# Altium PCB PCB1.PcbDoc
Units mil, origin at the board's own origin, x right, y up, seen from the top; angles counter-clockwise.
Board outline 1155 x 2185 mil, 2 copper layers (L1, L2), stack 62.756 mil thick; 43 components, 58 nets, 222 pads, 450 vias.
Unrouted connection lines stored in the file: 8.
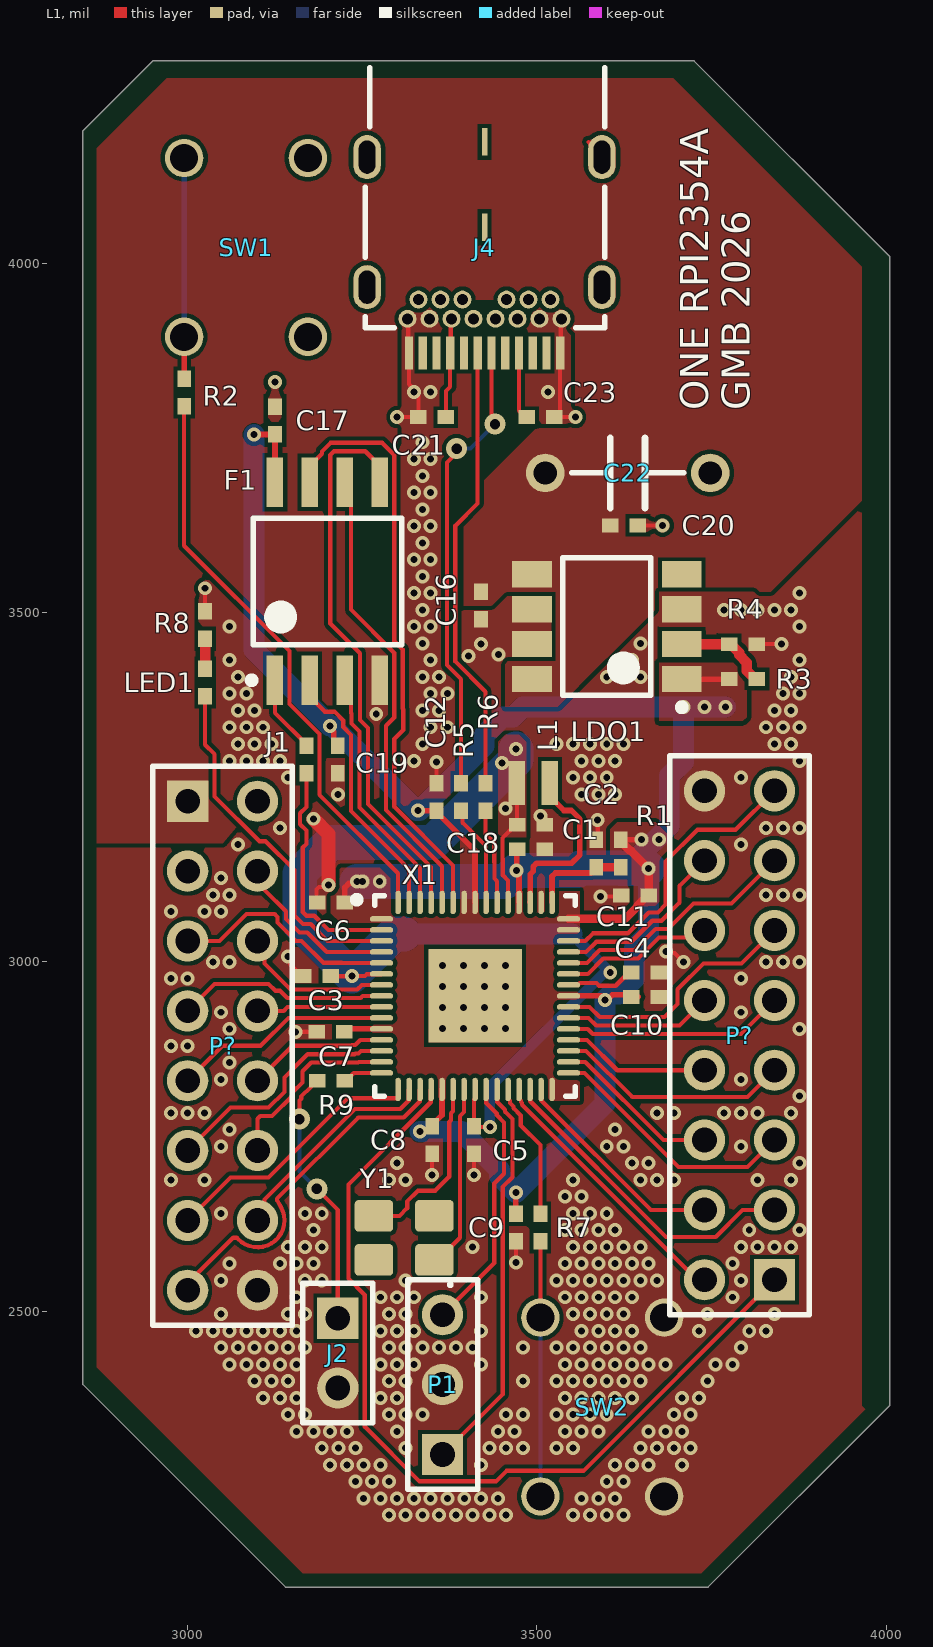
[diagram p0: L1 view]
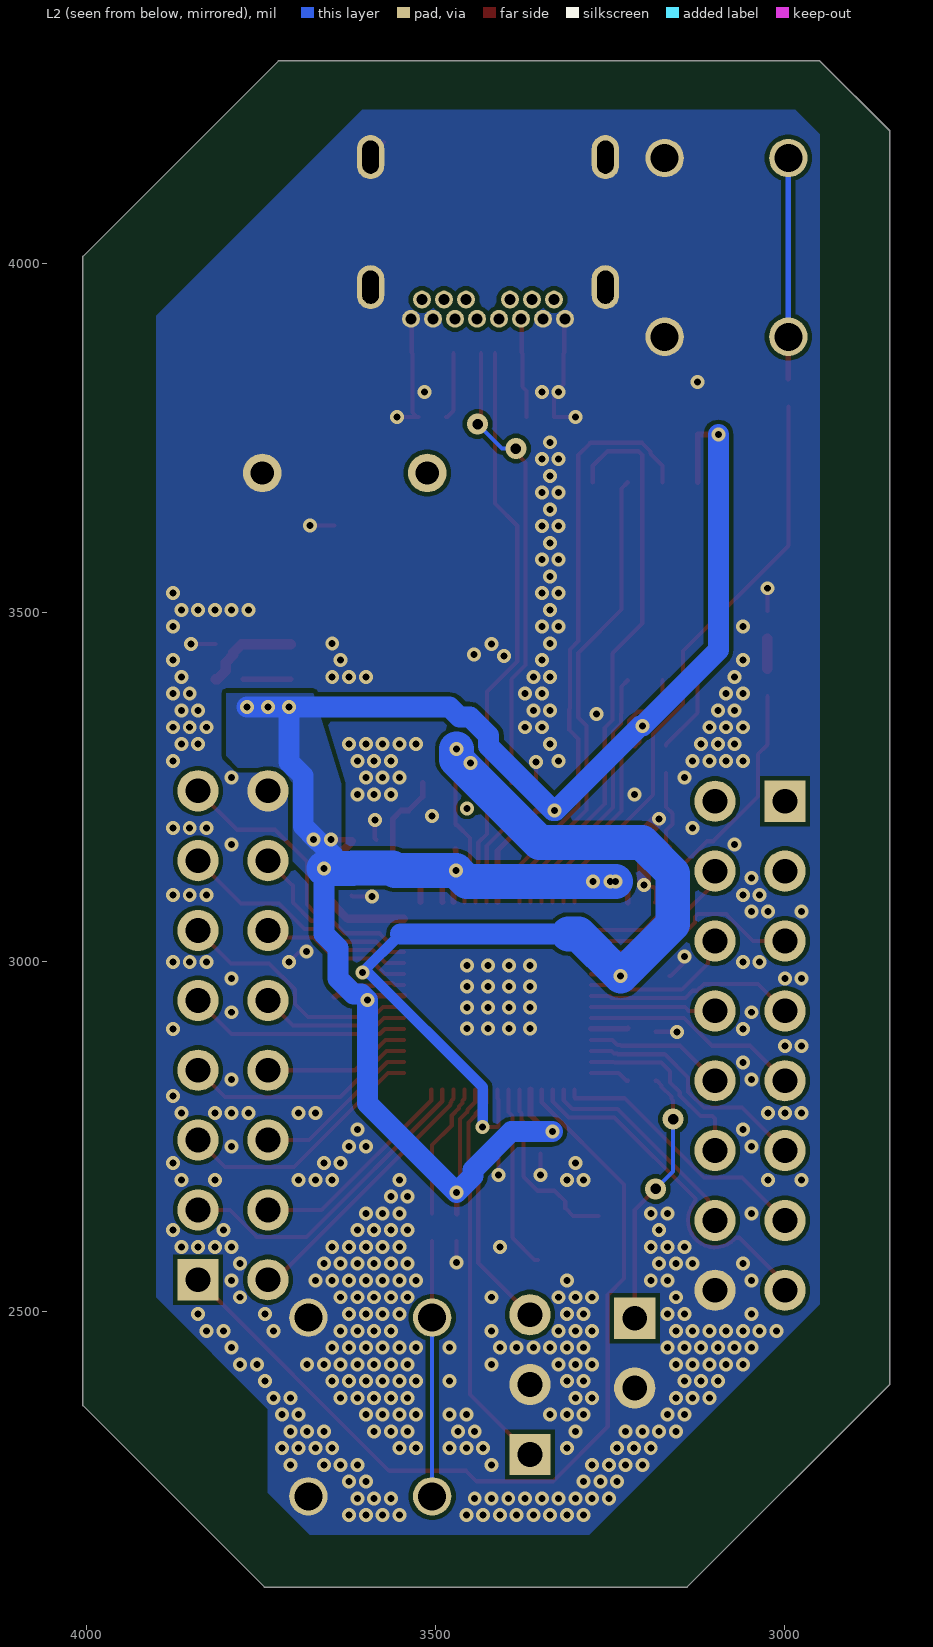
[diagram p1: L2 view, seen from below]

## Layer stack, top to bottom
Top Solder: solder mask 0.1, Solder Resist, Dk 1
L1: signal copper 1.378
Core: dielectric 60, FR-4, Dk 4.6
L2: signal copper 1.378
Bottom Solder: solder mask 0.1, Solder Resist, Dk 1

## Board outline
2850,2395 3140,2105 3745,2105 4005,2365 4005,4010 3725,4290 2950,4290 2850,4190

## Design rules (kind name [scope] priority, off if disabled: settings)
BoardOutlineClearance [All] p1: gap=15 ignorepadtopadclearanceinfootprint=FALSE
Clearance [All] p1: gap=6 ignorepadtopadclearanceinfootprint=FALSE
ComponentClearance [All] p1: gap=1 collisioncheckmode=3 verticalgap=1 showdistances=FALSE
DiffPairsRouting [All] p1: maxlimit=393.7 minlimit=6 mostfreqgap=8 toplayer_minwidth=6 toplayer_maxwidth=15 toplayer_prefwidth=8 bottomlayer_minwidth=6 bottomlayer_maxwidth=15 bottomlayer_prefwidth=8 substack1={1AE4DB25-43DE-4DBF-B0B8-6D5CFC875AB0} toplayer_{1ae4db25-43de-4dbf-b0b8-6d5cfc875ab0}_minwidth=15 toplayer_{1ae4db25-43de-4dbf-b0b8-6d5cfc875ab0}_maxwidth=15 toplayer_{1ae4db25-43de-4dbf-b0b8-6d5cfc875ab0}_prefwidth=15 bottomlayer_{1ae4db25-43de-4dbf-b0b8-6d5cfc875ab0}_minwidth=15 bottomlayer_{1ae4db25-43de-4dbf-b0b8-6d5cfc875ab0}_maxwidth=15 bottomlayer_{1ae4db25-43de-4dbf-b0b8-6d5cfc875ab0}_prefwidth=15 substack2={37110629-F1B0-4C59-9EA7-80770A34A5BA} toplayer_{37110629-f1b0-4c59-9ea7-80770a34a5ba}_minwidth=15 toplayer_{37110629-f1b0-4c59-9ea7-80770a34a5ba}_maxwidth=15 toplayer_{37110629-f1b0-4c59-9ea7-80770a34a5ba}_prefwidth=15 bottomlayer_{37110629-f1b0-4c59-9ea7-80770a34a5ba}_minwidth=15 bottomlayer_{37110629-f1b0-4c59-9ea7-80770a34a5ba}_maxwidth=15 bottomlayer_{37110629-f1b0-4c59-9ea7-80770a34a5ba}_prefwidth=15 maxuncoupledlength=500
HoleSize [All] p1: absolutevalues=TRUE maxlimit=265 minlimit=13 maxpercent=80.000 minpercent=20.000
HoleToHoleClearance [All] p1: gap=10 allowstackedmicrovias=FALSE
MinimumAnnularRing [All] p1: minimumring=7
MinimumSolderMaskSliver [All] p1: minsoldermaskwidth=0
PlaneClearance [All] p1: clearance=10
PlaneConnect [All] p1: planeconnectstyle=Direct reliefexpansion=16 reliefentries=4 reliefconductorwidth=6 reliefairgap=6
PolygonConnect [All] p1: connectstyle=Direct reliefconductorwidth=8 reliefentries=4 polygonreliefangle="90 Angle" airgapwidth=6
RoutingCorners [All] p1: cornerstyle=45-Degree minsetback=49.21 maxsetback=49.21
RoutingVias [All] p1: holewidth=15 width=30 viastyle="Through Hole" minholewidth=10 minwidth=20 maxholewidth=100 maxwidth=114
SilkToSilkClearance [All] p1: silktosilkclearance=0
SilkToSolderMaskClearance [IsPad] p1: minsilkscreentomaskgap=6 clearancetoexposedcopper=TRUE
SolderMaskExpansion [All] p1: expansion=2.95 istentingtop=FALSE
SupplyNets "Schematic Supply Nets_2" [InNet('V5P5V')] p1: voltage=0.000
SupplyNets "Schematic Supply Nets_1" [InNet('GND')] p2: voltage=0.000
SupplyNets "Schematic Supply Nets" [InNet('V3P3V')] p3: voltage=0.000
Width [All] p1: maxlimit=400 minlimit=6 preferedwidth=8 substack1={1AE4DB25-43DE-4DBF-B0B8-6D5CFC875AB0} substack2={37110629-F1B0-4C59-9EA7-80770A34A5BA}
20 further rules are at their usual default settings.

## Classes and differential pairs
component class Master: C1 C2 C3 C4 C5 C6 C7 C8 C9 C10 C11 C12 C16 C17 C18 C19 F1 J1 J2 L1 LDO1 LDO1_Master LED1 P1 R1 R2 R3 R4 R5 R6 R7 R8 R9 SW1 SW2 X1 Y1
component class HUB: C20 C21 C22 C23 J4 P?

## Components (designator, comment, footprint, x,y, rotation, side; value= is the part's Value field where it differs from the comment)
C1 "GMC04X5R475K10NT" 0402 3491.43,3196.38 r180 top value=100pF
C2 "GMC04X5R475K10NT" 0402 3585,3155.31 r270 top value=100pF
C3 "GMC04Y5V104Z10NT" 0402 3185,2980 r0 top value=100pF
C4 "GMC04Y5V104Z10NT" 0402 3655,2985 r180 top value=100pF
C5 "GMC04X5R475K10NT" 0402 3410,2745.31 r90 top value=100pF
C6 "GMC04Y5V104Z10NT" 0402 3205.31,3085 r0 top value=100pF
C7 "GMC04Y5V104Z10NT" 0402 3204.68,2900 r0 top value=100pF
C8 "GMC04Y5V104Z10NT" 0402 3350,2745 r90 top value=100pF
C9 "GMC04Y5V104Z10NT" 0402 3470,2620 r90 top value=100pF
C10 "GMC04Y5V104Z10NT" 0402 3655,2950 r180 top value=100pF
C11 "GMC04Y5V104Z10NT" 0402 3640.31,3095 r0 top value=100pF
C12 "GMC04Y5V104Z10NT" 0402 3356.43,3236.06 r270 top value=100pF
C16 "GMC10X5R106K6R3NT" 0402 3420,3510 r90 top value=100pF
C17 "GMC10X5R106K6R3NT" 0402 3125,3775 r270 top value=100pF
C18 "GMC04X5R475K10NT" 0402 3491.43,3161.38 r180 top value=100pF
C19 "GMC04Y5V104Z10NT" 0402 3215,3290 r90 top value=100pF
C20 "GMC10X5R106K6R3NT" 0402 3625,3625 r180 top value=100pF
C21 "GMC10X5R106K6R3NT" 0402 3350,3780 r0 top value=100pF
C22 "Electrolytic" "Axial C - small" 3630,3700 r270 top value=100pF
C23 "GMC10X5R106K6R3NT" 0402 3505,3780 r180 top value=100pF
F1 "AT25SF128A-SHB-T" SOIC127P800X216-8N 3200,3545 r90 top
J1 "RM04J000CT" 0402 3170,3290 r90 top value=1K
J2 "jumper_1x2" HDR1X2 3215,2490 r270 top
J4 "632723100011" 632723100011 3425,4105 r180 top
L1 "WIP201610S-4R7MLDG" 2016[0806] 3471.43,3256.38 r0 top value=10mH
LDO1 "ADPL42010A" SOIC127P600X175-8N 3600,3480 r180 top
LED1 "LC292LGCT-5A-U1" 0402 3025,3400 r90 top
P1 "Debug" HDR1X3 3365,2295 r90 top
P? "Header 16" HDR2X8 3840,2545 r90 top
P? "Header 16" HDR2X8 3000,3230 r270 top
R1 "RM04J330CT" 0402 3620,3155 r90 top value=1K
R2 "RM04J102CT" 0402 2995,3815 r270 top value=1K
R3 "RM04F5760CT" 0402 3795,3405 r180 top value=1K
R4 "RM04J102CT" 0402 3795.32,3455 r180 top value=1K
R5 "RMCF0402JT27R0" 0402 3391.43,3236.38 r270 top value=1K
R6 "RMCF0402JT27R0" 0402 3426.43,3236.38 r270 top value=1K
R7 "RM04J102CT" 0402 3505,2620 r270 top value=1K
R8 "RM04J102CT" 0402 3025,3482.56 r270 top value=1K
R9 "RM04J102CT" 0402 3205,2830 r0 top value=1K
SW1 "PushButton" CT11024.3F260 3172.17,4150.91 r270 top
SW2 "PushButton" CT11024.3F260 3505,2235 r90 top
X1 "RPI2354A" QFN40P700X700X85_HS-61N 3411.43,2951.38 r0 top
Y1 "12M10PI/XT324-10/20" DFN320X250X70-4N 3310,2605 r180 top

## Footprints (in the part's own frame and the unit in brackets; to place one, negate y for a bottom-side part, rotate by r counter-clockwise, add the part's x,y. Pads: shape width x height; smd on the part's side, far side on the other; paste and mask are expansions set on the pad)
0402 [mm] "Chip Capacitor, Body 1.0x0.5mm, IPC High Density"
  rect 0.6x0.5 smd: 1(-0.5,0) 2(0.5,0)
  body extent -0.55,-0.3 0.55,0.3, height 1.3
2016[0806] [mm]
  rect 0.6x1.6 smd: 1(0,0) 2(1.2,0)
  body extent -0.06,-0.62 1.2,0.64, height 1.3
632723100011 [mm] "USB 3.1 Type C Receptacle Horizontal THR"
  rect 0.3x1.2 smd: A1(-2.75,5.93) A2(-2.25,5.93) A3(-1.75,5.93) A4(-1.25,5.93) A5(-0.75,5.93) A6(-0.25,5.93) A7(0.25,5.93) A8(0.75,5.93) A9(1.25,5.93) A10(1.75,5.93) A11(2.25,5.93) A12(2.75,5.93)
  round 0.65 hole 0.4: B1(2.8,4.68) B2(2.4,3.98) B3(1.6,3.98) B4(1.2,4.68) B5(0.8,3.98) B6(0.4,4.68) B7(-0.4,4.68) B8(-0.8,3.98) B9(-1.2,4.68) B10(-1.6,3.98) B11(-2.4,3.98) B12(-2.8,4.68) Shell(-2,4.68) Shell(2,4.68)
  oval 1x1.6 hole 0.6 slot 1.2 at 90 deg: Shell(-4.27,3.53) Shell(-4.27,-1.2) Shell(4.27,3.53) Shell(4.27,-1.2)
  rect 0.2x1 smd: Shell(0,1.35) Shell(0,-1.75)
  silkscreen extent -4.37,-4.45 4.34,5, body extent -4.37,-5.62 4.37,6.2, height 3.05
"Axial C - small" [mm]
  round 1.4 hole 0.85: 1(0,-3) 2(0,3)
  silkscreen extent -1.27,-2.03 1.27,2.03
CT11024.3F260 [mil]
  round 55 hole 40: 1(0,0) 1(255.91,0) 2(0,-177.17) 2(255.91,-177.17)
  body extent 0,-177 256,0, height 169
DFN320X250X70-4N [mm] "DFN, 4-Leads, Body 3.20x2.50mm, Pitch 2.10mm, IPC Medium Density"
  rrect25% 1.4x1.15 smd: 1(-1.1,0.8) 2(1.1,-0.8) 3(-1.1,-0.8) 4(1.1,0.8)
  silkscreen extent -1.74,1.64 -1.61,1.76, body extent -1.6,-1.25 1.6,1.25, height 0.7
HDR1X2 [mm] "Connector; Header; 2 Position"
  rect 1.5x1.5 hole 0.9: 1(0,0)
  round 1.5 hole 0.9: 2(2.54,0)
  silkscreen extent -1.27,-1.27 3.81,1.27
HDR1X3 [mm] "Connector; Header; 3 Position"
  rect 1.5x1.5 hole 0.9: 1(0,0)
  round 1.5 hole 0.9: 2(2.54,0) 3(5.08,0)
  silkscreen extent -1.27,-1.27 6.35,1.27
HDR2X8 [mm] "Connector; Header; 8x2 Position"
  rect 1.5x1.5 hole 0.9: 1(0,0)
  round 1.5 hole 0.9: 2(0,2.54) 3(2.54,0) 4(2.54,2.54) 5(5.08,0) 6(5.08,2.54) 7(7.62,0) 8(7.62,2.54) 9(10.16,0) 10(10.16,2.54) 11(12.7,0) 12(12.7,2.54) 13(15.24,0) 14(15.24,2.54) 15(17.78,0) 16(17.78,2.54)
  silkscreen extent -1.27,-1.27 19.05,3.81
QFN40P700X700X85_HS-61N [mm] "QFN, 60-Leads, Body 7.00x7.00mm, Pitch 0.40mm, Thermal Pad 3.40x3.40mm, IPC Medium Density"
  oval 0.85x0.2 smd: 1(-3.4,2.8) 2(-3.4,2.4) 3(-3.4,2) 4(-3.4,1.6) 5(-3.4,1.2) 6(-3.4,0.8) 7(-3.4,0.4) 8(-3.4,0) 9(-3.4,-0.4) 10(-3.4,-0.8) 11(-3.4,-1.2) 12(-3.4,-1.6) 13(-3.4,-2) 14(-3.4,-2.4) 15(-3.4,-2.8) 31(3.4,-2.8) 32(3.4,-2.4) 33(3.4,-2) 34(3.4,-1.6) 35(3.4,-1.2) 36(3.4,-0.8) 37(3.4,-0.4) 38(3.4,0) 39(3.4,0.4) 40(3.4,0.8) 41(3.4,1.2) 42(3.4,1.6) 43(3.4,2) 44(3.4,2.4) 45(3.4,2.8)
  oval 0.2x0.85 smd: 16(-2.8,-3.4) 17(-2.4,-3.4) 18(-2,-3.4) 19(-1.6,-3.4) 20(-1.2,-3.4) 21(-0.8,-3.4) 22(-0.4,-3.4) 23(0,-3.4) 24(0.4,-3.4) 25(0.8,-3.4) 26(1.2,-3.4) 27(1.6,-3.4) 28(2,-3.4) 29(2.4,-3.4) 30(2.8,-3.4) 46(2.8,3.4) 47(2.4,3.4) 48(2,3.4) 49(1.6,3.4) 50(1.2,3.4) 51(0.8,3.4) 52(0.4,3.4) 53(0,3.4) 54(-0.4,3.4) 55(-0.8,3.4) 56(-1.2,3.4) 57(-1.6,3.4) 58(-2,3.4) 59(-2.4,3.4) 60(-2.8,3.4)
  rect 3.4x3.4 smd: 47(0,0)
  silkscreen extent -4.42,-3.65 3.65,3.65, body extent -3.5,-3.5 3.5,3.5, height 0.85
SOIC127P600X175-8N [mm] "SOIC, 8-Leads, Body 4.90x3.90mm, Pitch 1.27mm, IPC Medium Density"
  rect 1.45x0.95 smd: 1(-2.725,1.905) 2(-2.725,0.635) 3(-2.725,-0.635) 4(-2.725,-1.905) 5(2.725,-1.905) 6(2.725,-0.635) 7(2.725,0.635) 8(2.725,1.905)
  silkscreen extent -2.85,-2.5 1.6,3.05, body extent -2,-2.5 2,2.5, height 1.76
SOIC127P800X216-8N [mm] "SOIC, 8-Leads, Body 5.26x5.29mm, Pitch 1.27mm, IPC Medium Density"
  rect 1.8x0.6 smd: 1(-3.6,1.905) 2(-3.6,0.635) 3(-3.6,-0.635) 4(-3.6,-1.905) 5(3.6,-1.905) 6(3.6,-0.635) 7(3.6,0.635) 8(3.6,1.905)
  silkscreen extent -3.72,-2.7 2.3,2.88, body extent -2.7,-2.7 2.7,2.7, height 2.16

## Part data
C1 C2 C3 C4 C5 C6 C7 C8 C9 C10 C11 C12 C16 C17 C18 C19 C20 C21 C23: library part Cap, "Capacitor", LatestRevisionDate=17-Jul-2002, LatestRevisionNote="Re-released for DXP Platform.", PackageDescription="Radial Cap, Thru-Hole; 2 Leads; 0.3 in Pin Spacing", PackageReference=RAD-0.3, Published=8-Jun-2000, Publisher="Altium Limited", Simulation ModelName=CAP, Simulation PortMap=(1:1),(2:2)
C22: library part "Cap Pol1", "Polarized Capacitor (Radial)", LatestRevisionDate=17-Jul-2002, LatestRevisionNote="Re-released for DXP Platform.", PackageDescription="Polarized Capacitor (Radial); 2 Leads", PackageReference=RB7.6-15, Published=8-Jun-2000, Publisher="Altium Limited", Simulation ModelName=CAP, Simulation PortMap=(1:1),(2:2)
J1 R1 R2 R3 R4 R5 R6 R7 R8 R9: library part Res1, "Resistor", LatestRevisionDate=17-Jul-2002, LatestRevisionNote="Re-released for DXP Platform.", PackageDescription="Axial Device, Thru-Hole; 2 Leads; 0.3 in Pin Spacing", PackageReference=AXIAL-0.3, Published=8-Jun-2000, Publisher="Altium Limited", Simulation ModelName=RESISTOR, Simulation PortMap=(1:1),(2:2)
J4: library part 2171830001, "Universal Serial Bus (USB) Shielded I/O Receptacle, Type C, Right-Angle, Hybrid, Top Mount, 1.20mm Tab, Gold (Au) Plating", Manufacturer_Name=Molex, Copyright="Copyright (C) 2026 Ultra Librarian. All rights reserved.", Manufacturer_Part_Number=2171830001, RefDes=RefDes, Type=Type
L1: library part Inductor, "Inductor", Code_IEC=1005, Code_JEITA=0402, LatestRevisionDate=29-May-2009, LatestRevisionNote="IPC-7351 Footprint Added.", PackageDescription="Chip Inductor", PackageReference=0402-A, Published=8-Jun-2000, Publisher="Altium Limited", Simulation ModelName=INDUCTOR, Simulation PortMap=(1:1),(2:2)
LED1: library part LED0, "Typical INFRARED GaAs LED", LatestRevisionDate=08-Jul-2005, LatestRevisionNote="Mech Layer 1 removed.", PackageDescription="LED; 2 Leads", PackageReference=LED-0, Published=8-Jun-2000, Publisher="Altium Limited", Simulation ModelName=LED0, Simulation PortMap=(1:1),(2:2)
P1: library part "Header 3", "Header, 3-Pin", LatestRevisionDate=17-Jul-2002, LatestRevisionNote="Re-released for DXP Platform.", Publisher="Altium Limited"
P? P?: "Header, 16-Pin", LatestRevisionDate=17-Jul-2002, LatestRevisionNote="Re-released for DXP Platform.", Publisher="Altium Limited"
SW1 SW2: "GPTS203211B"
Y1: library part XTAL, "Crystal Oscillator", LatestRevisionDate=17-Jul-2002, LatestRevisionNote="Re-released for DXP Platform.", PackageDescription="Crystal, Thru-Hole; 2 Leads; Body 3.1 x 8.2 mm (Dia.xH)", PackageReference=R38, Published=8-Jun-2000, Publisher="Altium Limited", Simulation ModelName=XTAL, Simulation PortMap=(1:1),(2:2)

## Via types
v1: diameter 20, hole 10, L1 to L2, 445 vias
v2: diameter 30, hole 15, L1 to L2, 4 vias
v3: diameter 20, hole 10, L1 to L2, tented both sides, 1 vias

## Nets (pads, with @x,y where several pads share a name; then routed paths per layer and width w, separated by ;. In a path a pad name is that pad's centre, name@x,y a point inside that pad or via, vN(x,y) a via of type N, cw(c..) or ccw(c..) an arc to the next point about the centre after c; other vN are vias at no path point)
AVDD: C2.2 R1.1 X1.46 | length 142.1
  L1 w8: X1.46 3521.67,3122.69 3526.36,3127.38 3577.06,3127.38 3577.5,3127.82 3579.16,3127.82 3585.16,3133.82 C2.2@3585.16,3135.47
  L1 w12: C2.2@3585.16,3135.47 3619.84,3135.47 R1.1
DVDD: C1.2 C3.2 C4.2 C5.2 L1.1 X1.6 X1.23 X1.39 X1.50 | length 1721
  L1 w6: C3.2 3205.06,2979.62 v1(3235,2979.62) ; v1@3235,2980 3254,2980 3256.52,2982.52 3277.22,2982.52 X1.6 ; X1.23 3411.43,2804.22 3410,2802.78 C5.2 3411.28,2763.72 v1(3432.65,2763.72) ; X1.50 3458.68,3116.77 3451.18,3124.26 3451.18,3147.56 3450.94,3147.81 3450.94,3177.54 3469.78,3196.38 C1.2 3471.43,3196.69 L1.1 ; X1.39 3558.59,2967.13 3561.4,2969.94 3585.17,2969.94 3589.11,2966 3612.87,2966 3625.03,2978.16 3628.47,2978.16 C4.2
  L2 w15: v1(3432.65,2763.72) 3432.65,2820.99 3595.71,2984.04 3604.04,2984.04 v1(3605,2985) 3550,3040
  L2 w30: 3310,3040 3550,3040
  L2 w50: 3310,3040 3295.38,3040 v1(3235,2979.62) 3160.53,3054.09 3160.53,3126.9 3204.63,3171 3351.05,3171 3470,3289.95 v1(3470,3305)
  other v1: 3455,3220 3450,3285
G2: P?.4@3100,3130 X1.4 | length 241.7
  L1 w6: P?.4@3100,3130 3110.15,3119.85 3110.15,3103.29 3140.82,3072.63 3140.82,3061.49 3160.15,3042.16 3171.29,3042.16 3199.07,3014.37 X1.4
G3: P?.5@3000,3030 X1.5 | length 327.1
  L1 w6: P?.5@3000,3030 3045.51,3030 3084.04,3068.53 3124.62,3068.53 3128.82,3064.33 3128.82,3056.52 3155.18,3030.16 3162.99,3030.16 3194.3,2998.84 3220.22,2998.84 3220.44,2998.62 X1.5
G4: P?.6@3100,3030 X1.7 | length 221.8
  L1 w6: P?.6@3100,3030 3110.15,3019.85 3110.15,2997.98 3147.51,2960.62 3242.87,2960.62 3249.37,2967.13 X1.7
G5: P?.7@3000,2930 X1.8 | length 302.9
  L1 w6: P?.7@3000,2930 3038.53,2968.53 3115.96,2968.53 3125.76,2958.73 3132.43,2958.73 3142.54,2948.62 3247.84,2948.62 3250.6,2951.38 X1.8
G6: P?.8@3100,2930 X1.9 | length 179.9
  L1 w6: P?.8@3100,2930 3137.52,2930 3143.15,2935.63 X1.9
G7: P?.9@3000,2830 X1.10 | length 314.8
  L1 w6: P?.9@3000,2830 3050.02,2880.02 3104.5,2880.02 3144.37,2919.88 X1.10
G8: P?.10@3100,2830 X1.12 | length 201.8
  L1 w6: P?.10@3100,2830 3150,2880 3234.07,2880 3235.22,2881.16 3239.91,2881.16 3247.14,2888.39 X1.12
G9: P?.11@3000,2730 X1.13 | length 348.7
  L1 w6: P?.11@3000,2730 3061.47,2791.47 3115.96,2791.47 3138.53,2814.04 3138.53,2834.56 3171.96,2868 3239.04,2868 3239.93,2868.89 3244.61,2868.89 3248.36,2872.64 X1.13
G10: P?.12@3100,2730 X1.14 | length 268.8
  L1 w6: P?.12@3100,2730 3100,2775.51 3103.96,2779.47 3120.93,2779.47 3150.53,2809.07 3150.53,2813.56 3164.5,2827.53 3164.5,2843.57 3176.93,2856 3244.01,2856 3244.9,2856.89 X1.14
G12: P?.13@3000,2630 X1.16 | length 385.7
  L1 w6: P?.13@3000,2630 3061.47,2691.47 3115.96,2691.47 3229.49,2805 3300.33,2805 3301.2,2805.87 X1.16
G13: P?.14@3100,2630 X1.17 | length 315.5
  L1 w6: P?.14@3100,2630 3110.15,2640.15 3110.15,2660.15 3239.38,2789.38 3304.38,2789.38 3316.59,2801.59 3316.59,2817.16 X1.17
G14: P?.15@3000,2530 X1.18 | length 514.3
  L1 w6: P?.15@3000,2530 3000,2540 3065.28,2605.28 3067.77,2605.28 3070.25,2605.28 3072.01,2603.52 cw(c3067.77,2599.28) 3072.06,2603.47 ccw(c3100,2630) 3133.52,2649 3128.1,2658.6 ; 3128.1,2658.64 3128.1,2661.12 3244.35,2777.38 3309.35,2777.38 3332.33,2800.36 3332.33,2817.16 X1.18
G15: P?.1@3840,2545 X1.19 | length 1279.9
  L1 w6: X1.19 3348.08,2817.16 3348.08,2799.14 3230.13,2681.19 3230.13,2546.65 3253.53,2523.26 3253.53,2334.69 3331.74,2256.47 3441.61,2256.47 3456.64,2271.5 3566.5,2271.5 P?.1@3840,2545
G16: P?.2@3740,2545 X1.27 | length 388.9
  L1 w6: X1.27 3474.42,2804.22 3477.24,2801.41 3477.24,2799.37 3478.53,2798.07 3478.53,2795.63 3729.16,2545 P?.2@3740,2545
G17: P?.3@3840,2645 X1.28 | length 462.9
  L1 w6: X1.28 3490.53,2817.16 3490.53,2800.6 3684.65,2606.47 3755.96,2606.47 3794.49,2645 P?.3@3840,2645
G18: P?.4@3740,2645 X1.29 | length 314.5
  L1 w6: X1.29 3506.28,2817.16 3506.28,2801.82 3663.1,2645 P?.4@3740,2645
G19: P?.5@3840,2745 X1.31 | length 366.4
  L1 w6: X1.31 3567.97,2841.14 3702.64,2706.47 3801.47,2706.47 P?.5@3840,2745
G20: P?.6@3740,2745 X1.32 | length 241.1
  L1 w6: X1.32 3569.19,2856.89 3681.08,2745 P?.6@3740,2745
G21: P?.7@3840,2845 X1.33 | length 338.1
  L1 w6: X1.33 3570.41,2872.64 3636.58,2806.47 3801.47,2806.47 P?.7@3840,2845
G22: P?.8@3740,2845 X1.34 | length 212.7
  L1 w6: X1.34 3571.64,2888.39 3615.02,2845 P?.8@3740,2845
G23: P?.9@3840,2945 X1.35 | length 317.5
  L1 w6: X1.35 3572.86,2904.13 3579.99,2897 3792,2897 P?.9@3840,2945
G24: P?.10@3740,2945 X1.36 | length 214.1
  L1 w6: X1.36 3574.08,2919.88 3584.96,2909 3704,2909 P?.10@3740,2945
G25: P?.11@3840,3045 X1.37 | length 364.6
  L1 w6: X1.37 3575.3,2935.63 3589.93,2921 3682.87,2921 3701.47,2939.6 3701.47,2960.96 3738.42,2997.9 3792.9,2997.9 P?.11@3840,3045
G26: P?.12@3740,3045 X1.40 | length 220.4
  L1 w6: X1.40 3572.87,2982.87 3595,3005 3645,3005 3675,3035 3730,3035 P?.12@3740,3045
G27: P?.13@3840,3145 X1.41 | length 355.3
  L1 w6: X1.41 3571.65,2998.62 3590.03,3017 3640.03,3017 3670.03,3047 3687.51,3047 3724.04,3083.53 3778.53,3083.53 P?.13@3840,3145
G28: P?.14@3740,3145 X1.42 | length 263
  L1 w6: X1.42 3570.43,3014.37 3585.06,3029 3635.06,3029 3665.06,3059 3678.16,3059 3704,3084.85 3704,3109 P?.14@3740,3145
G29: P?.15@3840,3245 X1.43 | length 419.8
  L1 w6: X1.43 3569.21,3030.12 3580.09,3041 3630.09,3041 3660.09,3071 3673.18,3071 3684.31,3082.13 3684.31,3143.8 3729.84,3189.32 3784.32,3189.32 P?.15@3840,3245
GND: C1.1 C2.1 C3.1 C4.1 C5.1 C6.1 C7.1 C8.1 C9.1 C10.1 C11.1 C12.1 C16.1 C17.1 C18.1 C19.1 C20.1 C21.1 C22.2 C23.1 F1.4 J2.2 J4.A1 J4.A12 J4.B1 J4.B12 J4.Shell LDO1.3 LDO1.6 LDO1.7 P1.2 P?.16 R4.1 R8.1 SW1.1 SW2.2 X1.47 | length 910
  L1 w6: R8.1 v1(3025,3535) ; v1(3143.9,3007.52) 3146.58,3004.84 3146.58,2996.77 3163.35,2980 C3.1 ; v1(3154.68,2900) C7.1 ; C6.1 3184.32,3086.31 3184.32,3103.84 3187.83,3107.36 3198.97,3107.36 v1(3201.53,3109.91) ; v1(3300,3780) C21.1 3330.32,3813.54 3316.73,3827.12 J4.A12 3315.75,3872.52 3315.75,3919.76 J4.B1 ; v1(3350,2695) C8.1 ; C12.1 v1(3356.43,3286.38) ; v1(3410,2695) C5.1 ; v1(3470,2570) C9.1 ; J4.B12 3534.25,3919.76 3534.25,3872.52 J4.A1 3533.27,3786.84 3526.43,3780 C23.1 v1(3555,3780) ; 3574.24,4173.9 3593.11,4155.03 J4.Shell@3593.11,4152.24 ; C2.1 3587.04,3177.04 v1(3587.04,3203.27) ; v1(3590.88,3093.74) 3619.37,3093.74 C11.1 ; C20.1 v1(3680,3625) ; v1(3685,3015) 3687.06,3012.94 3697.06,3012.94 v1(3710,3000) ; R4.1 v1(3850,3455)
  L1 w20: v3(3180,3205) 3201.53,3183.47 v1(3201.53,3109.91)
  other v1: 3288,2208 3312,2208 3336,2208 3360,2208 3384,2208 3408,2208 3432,2208 3456,2208 3552,2208 3576,2208 3600,2208 3624,2208 3252,2232 3276,2232 3300,2232 3324,2232 3348,2232 3372,2232 3396,2232 3420,2232 3444,2232 3564,2232 3588,2232 3612,2232 3240,2256 3264,2256 3288,2256 3600,2256 3624,2256 3204,2280 3228,2280 3252,2280 3276,2280 3420,2280 3612,2280 3636,2280 3660,2280 3708,2280 3192,2304 3216,2304 3240,2304 3312,2304 3432,2304 3456,2304 3480,2304 3528,2304 3552,2304 3648,2304 3672,2304 3696,2304 3720,2304 3156,2328 3180,2328 3204,2328 3228,2328 3300,2328 3444,2328 3468,2328 3540,2328 3564,2328 3588,2328 3660,2328 3684,2328 3708,2328 3144,2352 3168,2352 3288,2352 3312,2352 3336,2352 3456,2352 3480,2352 3528,2352 3552,2352 3576,2352 3600,2352 3696,2352 3720,2352 3108,2376 3132,2376 3156,2376 3276,2376 3300,2376 3540,2376 3564,2376 3588,2376 3612,2376 3636,2376 3708,2376 3732,2376 3096,2400 3120,2400 3144,2400 3288,2400 3312,2400 3480,2400 3528,2400 3552,2400 3576,2400 3600,2400 3624,2400 3648,2400 3744,2400 3060,2424 3084,2424 3108,2424 3132,2424 3156,2424 3276,2424 3300,2424 3324,2424 3420,2424 3540,2424 3564,2424 3588,2424 3612,2424 3636,2424 3660,2424 3684,2424 3756,2424 3780,2424 3048,2448 3072,2448 3096,2448 3120,2448 3144,2448 3168,2448 3288,2448 3312,2448 3336,2448 3360,2448 3384,2448 3408,2448 3480,2448 3528,2448 3552,2448 3576,2448 3600,2448 3624,2448 3648,2448 3792,2448 3012,2472 3036,2472 3060,2472 3084,2472 3108,2472 3132,2472 3156,2472 3276,2472 3300,2472 3324,2472 3420,2472 3564,2472 3588,2472 3612,2472 3636,2472 3732,2472 3804,2472 3828,2472 3048,2496 3144,2496 3168,2496 3288,2496 3312,2496 3552,2496 3576,2496 3600,2496 3624,2496 3744,2496 3840,2496 3156,2520 3276,2520 3300,2520 3324,2520 3420,2520 3540,2520 3564,2520 3588,2520 3612,2520 3636,2520 3780,2520 3048,2544 3168,2544 3192,2544 3312,2544 3528,2544 3552,2544 3576,2544 3600,2544 3624,2544 3648,2544 3672,2544 3792,2544 3060,2568 3132,2568 3156,2568 3180,2568 3540,2568 3564,2568 3588,2568 3612,2568 3636,2568 3660,2568 3780,2568 3144,2592 3168,2592 3192,2592 3408,2592 3552,2592 3576,2592 3600,2592 3624,2592 3648,2592 3792,2592 3816,2592 3840,2592 3864,2592 3180,2616 3540,2616 3564,2616 3588,2616 3612,2616 3804,2616 3876,2616 3048,2640 3168,2640 3192,2640 3552,2640 3576,2640 3600,2640 3540,2664 3564,2664 2976,2688 3024,2688 3288,2688 3312,2688 3552,2688 3648,2688 3672,2688 3696,2688 3816,2688 3864,2688 3300,2712 3636,2712 3660,2712 3876,2712 3048,2736 3600,2736 3624,2736 3792,2736 3060,2760 3612,2760 2976,2784 3000,2784 3024,2784 3672,2784 3696,2784 3768,2784 3792,2784 3816,2784 3864,2784 3876,2808 3048,2832 3792,2832 3060,2856 2976,2880 3000,2880 3060,2904 3876,2904 3365,2905 3395,2905 3425,2905 3455,2905 3048,2928 3792,2928 3365,2935 3395,2935 3425,2935 3455,2935 3365,2965 3395,2965 3425,2965 3455,2965 2976,2976 3000,2976 3792,2976 3365,2995 3395,2995 3425,2995 3455,2995 3036,3000 3060,3000 3828,3000 3852,3000 3876,3000 2976,3072 3024,3072 3048,3072 3036,3096 3060,3096 3828,3096 3852,3096 3876,3096 3048,3120 3072,3168 3792,3168 3132,3192 3828,3192 3852,3192 3876,3192 3504.86,3208.77 3505.07,3208.98 3215,3240 3564,3240 3588,3240 3612,3240 3144,3264 3552,3264 3576,3264 3600,3264 3792,3264 3060,3288 3084,3288 3108,3288 3132,3288 3324,3288 3564,3288 3588,3288 3612,3288 3876,3288 3072,3312 3096,3312 3120,3312 3336,3312 3528,3312 3552,3312 3576,3312 3600,3312 3624,3312 3840,3312 3864,3312 3060,3336 3084,3336 3108,3336 3348,3336 3372,3336 3828,3336 3852,3336 3876,3336 3270,3355 3072,3360 3096,3360 3336,3360 3360,3360 3840,3360 3864,3360 3060,3384 3084,3384 3348,3384 3372,3384 3852,3384 3876,3384 3072,3408 3336,3408 3360,3408 3600,3408 3624,3408 3648,3408 3864,3408 3060,3432 3348,3432 3636,3432 3876,3432 3402.21,3437.91 3445,3440 3420.06,3454.99 3336,3456 3648,3456 3060,3480 3324,3480 3348,3480 3876,3480 3336,3504 3768,3504 3792,3504 3816,3504 3840,3504 3864,3504 3324,3528 3348,3528 3876,3528 3336,3552 3324,3576 3348,3576 3336,3600 3324,3624 3348,3624 3336,3648 3324,3672 3348,3672 3336,3696 3324,3720 3348,3720 3336,3744 3324,3816 3348,3816 3516,3816 3125,3830
M/S: R9.2 X1.15 | length 57.5
  L1 w6: R9.2 3226.65,2830 3237.8,2841.14 X1.15
NetC21_2: C21.2 C23.2 J4.A4 J4.A9 J4.B4 J4.B9 | length 241.4
  L1 w6: C21.2 3369.69,3817.28 3375.79,3823.38 J4.A9 3376.77,3872.52 3376.77,3919.76 J4.B4 ; J4.A4 3474.21,3789.13 3483.35,3780 C23.2
NetF1_1: F1.1 J1.2 | length 112.2
  L1 w6: F1.1 3125,3356.65 3170,3311.65 J1.2
NetF1_2: F1.2 X1.59 | length 385
  L1 w6: F1.2 3175,3379.65 3196.31,3358.33 3210.23,3358.33 3222.73,3345.83 3222.73,3336.33 3234,3325.07 3234,3216.25 3316.94,3133.3 X1.59
NetF1_3: F1.3 X1.58 | length 362.6
  L1 w6: F1.3 3233.81,3394.46 3233.81,3356.53 3234.73,3355.61 3234.73,3341.3 3246,3330.04 3246,3221.22 3332.69,3134.53 X1.58
NetF1_5: F1.5 X1.57 | length 805.6
  L1 w6: F1.5 3275,3710.35 3254.19,3731.17 3209.46,3731.17 3204.19,3725.89 3204.19,3484.52 3246.73,3441.98 3246.73,3346.27 3258,3335.01 3258,3226.19 3348.44,3135.75 X1.57
NetF1_6: F1.6 X1.56 | length 669.1
  L1 w6: F1.6 3233.81,3677.92 3233.81,3504.43 3295.81,3442.43 3295.81,3350.1 3283.81,3338.1 3283.81,3217.35 3364.19,3136.97 X1.56
NetF1_7: F1.7 X1.55 | length 853.2
  L1 w6: F1.7 3175,3710.35 3192.19,3727.54 3192.19,3730.86 3204.49,3743.17 3278.54,3743.17 3295.81,3725.89 3295.81,3459.4 3307.81,3447.4 3307.81,3362.54 3308.61,3361.75 3308.61,3331.92 3295.81,3319.13 3295.81,3222.32 3379.94,3138.19 X1.55
NetJ1_1: J1.1 X1.2 | length 331.8
  L1 w6: J1.1 3170,3221.87 3161,3212.87 3161,3197.13 3170,3188.13 3170,3169.06 3164.82,3163.88 3164.82,3071.43 3170.09,3066.16 3181.23,3066.16 3201.52,3045.87 X1.2
NetJ2_1: J2.1 R9.1 | length 374.4
  L1 w6: v2(3160,2775) 3160,2801.57 3162.53,2804.1 3162.53,2807.21 3176.5,2821.19 3176.5,2823.16 3183.35,2830 R9.1 ; v2(3185,2675) 3215,2645 J2.1
  L2 w6: v2(3160,2775) 3160,2700 v2(3185,2675)
NetJ4_A6: J4.A6 P?.2@3100,3230 R5.1 | length 666.2
  L1 w6: v2(3385,3735) 3385,3728.64 3371.21,3714.85 3371.21,3425.07 3391.43,3404.84 R5.1 ; J4.A6 3434.84,3775.16 v2(3440,3770)
  L2 w6: v2(3385,3735) 3405,3735 v2(3440,3770)
NetJ4_A7: J4.A7 P?.3@3000,3130 R6.1 | length 646.6
  L1 w6: J4.A7 3415.16,3656.45 3383.21,3624.5 3383.21,3430.04 3426.43,3386.81 R6.1
NetL1_2: L1.2 X1.48 | length 254
  L1 w8: X1.48 3490.24,3085.3 3490.24,3125.31 3494.92,3130 3494.92,3136.69 3499.61,3141.38 3549.72,3141.38 3561.43,3153.09 3561.43,3204.66 3549.32,3216.77 3538.6,3216.77 3518.68,3236.69 L1.2
NetLED1_1: LED1.1 X1.3 | length 511.9
  L1 w6: LED1.1 3025,3311.01 3038.53,3297.48 3038.53,3236.99 3102.66,3172.85 3111.63,3172.85 3152.82,3131.67 3152.82,3066.46 3165.12,3054.16 3176.26,3054.16 3200.3,3030.12 X1.3
NetLED1_2: LED1.2 R8.2 | length 43.2
  L1 w15: LED1.2 R8.2
NetP1_1: P1.1 X1.25 | length 573
  L1 w6: P1.1 3451,2381 3451,2677.87 3464.93,2691.8 3464.93,2775.28 3454.53,2785.68 3454.53,2788.13 3453.24,2789.42 3453.24,2789.54 3443.29,2799.49 3443.29,2817.16 X1.25
NetP1_3: P1.3 X1.24 | length 369.6
  L1 w6: P1.3 3439,2569 3439,2682.84 3452.93,2696.77 3452.93,2770.31 3442.53,2780.71 3442.53,2783.27 3427.54,2798.26 3427.54,2817.16 X1.24
NetR2_1: R2.1 SW1.2 | length 316.2
  L1 w8: R2.1 SW1.2@2995,3895
  L2 w8: SW1.2@2995,3895 SW1.2@2995,4150.91
NetR2_2: R2.2 X1.60 | length 836.9
  L1 w6: R2.2 2995,3595.8 3145.81,3444.99 3145.81,3369.19 3188.84,3326.16 3188.84,3239.29 3301.2,3126.93 X1.60
NetR5_2: R5.2 X1.52 | length 146.3
  L1 w6: R5.2 3393.41,3214.71 3393.41,3199.4 3426.94,3165.87 3426.94,3137.87 3427.18,3137.62 X1.52
NetR6_2: R6.2 X1.51 | length 138.3
  L1 w6: R6.2 3426.43,3183.35 3438.94,3170.84 3438.94,3142.84 3439.18,3142.59 3439.18,3119.29 3442.93,3115.54 X1.51
NetR7_1: R7.1 X1.26 | length 197
  L1 w6: X1.26 3458.68,2804.22 3461.49,2801.41 3461.49,2798.26 3465.24,2794.51 3465.24,2794.4 3466.53,2793.1 3466.53,2790.65 3476.93,2780.25 3476.93,2765.84 3505,2737.77 R7.1
NetR7_2: R7.2 SW2.1 | length 365.3
  L1 w6: SW2.1@3505,2490.91 R7.2
  L2 w6: SW2.1@3505,2235 SW2.1@3505,2490.91
NetX1_21: X1.21 Y1.2 | length 263.8
  L1 w6: Y1.2 3303.25,2636.5 3314.29,2647.54 3314.29,2657.09 3329.72,2672.51 3354.38,2672.51 3374.39,2692.52 3374.39,2770.69 3377.19,2773.49 3377.19,2783.54 3379.94,2786.29 X1.21
NetX1_22: X1.22 Y1.1 | length 264.5
  L1 w6: Y1.1 3358.23,2573.5 3389.87,2605.14 3389.87,2779.25 3395.68,2785.07 X1.22
V3P3V: C6.2 C7.2 C8.2 C9.2 C10.2 C11.2 C12.2 C17.2 C18.2 C19.2 F1.8 LDO1.1 R1.2 R3.2 X1.1 X1.11 X1.20 X1.30 X1.38 X1.44 X1.45 X1.49 X1.53 X1.54 | length 3670.2
  L1 w8: v1(3095,3755) 3095.16,3755.16 3124.84,3755.16 C17.2 F1.8 ; v1(3203.73,3337.96) 3203.73,3334.71 3209.16,3329.29 3209.16,3315.53 C19.2 ; C7.2@3224.69,2905 3225.49,2904.2 3277.51,2904.2 X1.11 ; C6.2 3225,3106.84 3230.86,3112.7 3239.91,3112.7 v1(3242.21,3115) ; v1(3330,3217) 3330.31,3216.69 3356.12,3216.69 C12.2 ; v1(3332.91,2757.09) 3335.2,2759.39 3344.71,2759.39 C8.2 ; C8.2@3350,2766.65 3364.19,2780.84 X1.20 ; C12.2@3356.43,3214.41 3411.43,3159.41 X1.53 ; C9.2 v1(3470,2670) ; v1(3471.12,3131.19) 3474.36,3131.19 3473.42,3130.25 3473.42,3125.65 3474.42,3124.64 X1.49 ; v1@3471.43,3134.12 3471.43,3161.06 C18.2 ; X1.38 3591.97,2951.38 v1(3597.66,2945.69) 3600.9,2945.69 3608.14,2952.92 3640.43,2952.92 3643.35,2950 C10.2@3645.31,2950 ; R1.2@3620,3172.72 3622.13,3174.84 3649.84,3174.84 v1(3650,3175) ; LDO1.1 R3.2
  L1 w12: X1.45 3625.87,3061.61 3644.44,3080.19 3644.44,3081.41 3658.03,3095 C11.2 v1(3660,3133.94) 3634.81,3159.13 3633.59,3159.13 R1.2@3620,3172.72
  L2 w30: v1(3095,3755) 3095,3446.69 v1(3203.73,3337.96) 3207.04,3337.96 3328,3217 3332,3217 3424,3309 3424,3324.05 3450.95,3351 3466,3351 3480,3365 v1@3704.93,3365 ; v1(3332.91,2757.09) 3391.75,2757.09 3446.42,2702.42 3446.42,2693.58 v1(3470,2670) 3597.66,2797.66 v1(3597.66,2945.69) 3605.97,2954 3617.84,2954 3640,2976.16 3640,3020 3660,3040 v1(3660,3133.94) ; v1(3471.12,3131.19) 3558.42,3131.19 ; 3628.94,3133.94 3660,3165 3672.5,3177.5 3689.47,3194.47 3689.47,3265.93 3710,3286.46 v1(3710,3365) v1(3740,3365) v1(3770,3365)
  L2 w50: v1(3242.21,3115) v1(3250,3115) v1(3275,3115) 3454.93,3115 v1(3471.12,3131.19) 3558.42,3131.19 3561.96,3134.74 3618.47,3134.74 3619.27,3133.94 3628.94,3133.94 v1(3660,3133.94)
  other v1: 3675,3175
V5P5V: C16.2 C20.2 C22.1 LDO1.5 LDO1.8 P?.1@3000,3230
Vadj: LDO1.2 R3.1 R4.2 | length 136.8
  L1 w15: LDO1.2 R4.2 3777.6,3455 3789.69,3442.91 3789.69,3439.57 3800.63,3428.63 3800.63,3417.09 3812.72,3405 R3.1
pads on no net: J4.A2 J4.A3 J4.A5 J4.A8 J4.A10 J4.A11 J4.B2 J4.B3 J4.B5 J4.B6 J4.B7 J4.B8 J4.B10 J4.B11 LDO1.4 Y1.3 Y1.4

## Polygon pours and split planes (outlines as drawn)
GND on L1 "AGND_L01_P-001" (solid, remove dead copper, pour order 18): 2870,2420 3165,2125 3735,2125 3970,2360 3965,2365 3965,3995 3695,4265 2970,4265 2870,4165
V5P5V on L1 "AGND_L01_P-001" (solid, remove dead copper, pour order 16): 3050,3170 2870,3170 2870,4165 2970,4265 3695,4265 3965,3995 3965,3660 3835,3530 3675,3530 3675,3510 3530,3365 3455,3365 3455,3450 3395,3510 3395,3660 3515,3780 3555,3780 3555,3900 3506.69,3948.31 3330.51,3948.31 3330.51,3936.5 3300,3905.98 3300,3385 3145,3230 3100,3230
V3P3V on L1 "V3P3V_L01_P013" (solid, remove dead copper, pour order 13): 3690,3180 3690,3162.46 3680,3152.46 3680,3080 3640,3080 3638.44,3081.17 3635.84,3083.77 3635.84,3117.5 3612.5,3117.5 3605,3125 3605,3190 3615,3200 3670,3200
GND on L1 "GND_L01_P012" (solid, pour order 12): 3675,3530 3810,3530 3875,3465 3875,3435 3868.63,3428.63 3800.63,3428.63 3800.63,3430 3755.63,3475 3675,3475
V3P3V on L1 "V3P3V_L01_P010" (solid, pour order 10): 3675,3430 3676.37,3428.63 3800.63,3428.63 3800.63,3350.63 3795,3345 3675,3345
GND on L1 "GND_L01_P009" (solid, pour order 9): 3527.26,3430.3 3527.26,3529.7 3395.3,3529.7 3395,3530 3395,3430
V5P5V on L1 "V5P5V_L01_P008" (solid, pour order 8): 3455,3365 3530,3365 3560,3395 3560,3530 3520,3530 3455,3430
V5P5V on L1 "V5P5V_L01_P007" (solid, pour order 7): 3555,3740 3625,3670 3625,3595 3560,3530 3455,3530 3435,3510 3395,3510 3395,3660 3475,3740
GND on L1 "GND_L01_P006" (solid, pour order 6): 3655,3015 3675,3035 3715,3035 3715,3030 3738.42,3006.58 3738.42,2997.9 3701.47,2960.96 3701.47,2939.6 3681.87,2920 3655,2920
DVDD on L1 "DVDD_L01_P005" (solid, pour order 5): 3491.43,3178.88 3485,3185.31 3485,3315 3475,3325 3455,3325 3445,3315 3445,3183.47 3450.94,3177.54
V3P3V on L1 "V3P3V_L01_P004" (solid, pour order 4): 3205,3070 3219,3056 3290.37,3056 3290.37,3119.63 3275,3135 3220,3135 3205,3120
V3P3V on L1 "V3P3V_L01_P003" (solid, pour order 3): 3411.43,3159.41 3390.07,3180.77 3390.07,3098.03 3408.09,3098.03 3411.43,3101.38
V3P3V on L1 "V3P3V_L01_P002" (solid, remove dead copper, pour order 2): 3561.43,3101.38 3561.43,2801.38 3261.43,2801.38 3261.43,3101.38
GND on L1 "GND_L01_P001" (solid, pour order 1): 3491.43,3211.38 3546.43,3211.38 3556.43,3201.38 3556.43,3156.38 3546.43,3146.38 3491.43,3146.38
GND on L2 "GND_L02_P015" (solid, remove dead copper, pour order 15): 2985,4220 3605,4220 3900,3925 3900,2520 3740,2360 3740,2240 3680,2180 3280,2180 2950,2510 2950,4185 2960,4195
V3P3V on L2 "V3P3V_L02_P014" (solid, pour order 14): 3800,3295 3783.11,3278.11 3726.29,3278.11 3704.47,3256.29 3704.47,3144.47 3675,3115 3635,3115 3635,3255 3675,3385 3800,3385

## Silkscreen, mask and mechanical layers (free items; w line width, h text height)
Top Overlay:
  text "ONE RPI2354A / GMB 2026" at 3805,3790 h40 r90
Mechanical 13:
  lines w1: 2850,2395 2850,4155 2850,4190 2950,4290 3248.75,4290 3566.25,4290 3725,4290 4005,4010 4005,2365 3745,2105 3140,2105 2850,2395

## Text inside footprints (layer, text, board x,y; h text height)
J4: Assembly Notes "PCB Edge" at 3491.93,4325.47 h28 r180